# Altium PCB Kasli-DIOT.PCBDOC (part 20 of 23)
Units mm, origin at the board's own origin, x right, y up, seen from the top; angles counter-clockwise.
Board outline 222.9 x 100 mm, 10 copper layers (TopLayer, Layer 2, Layer 3, Layer 4, Layer 5, Layer 6, Layer 7, layer 8, Layer 9, BottomLayer), stack 1.564 mm thick; 977 components, 900 nets, 4676 pads, 2725 vias.
Unrouted connection lines stored in the file: 17.
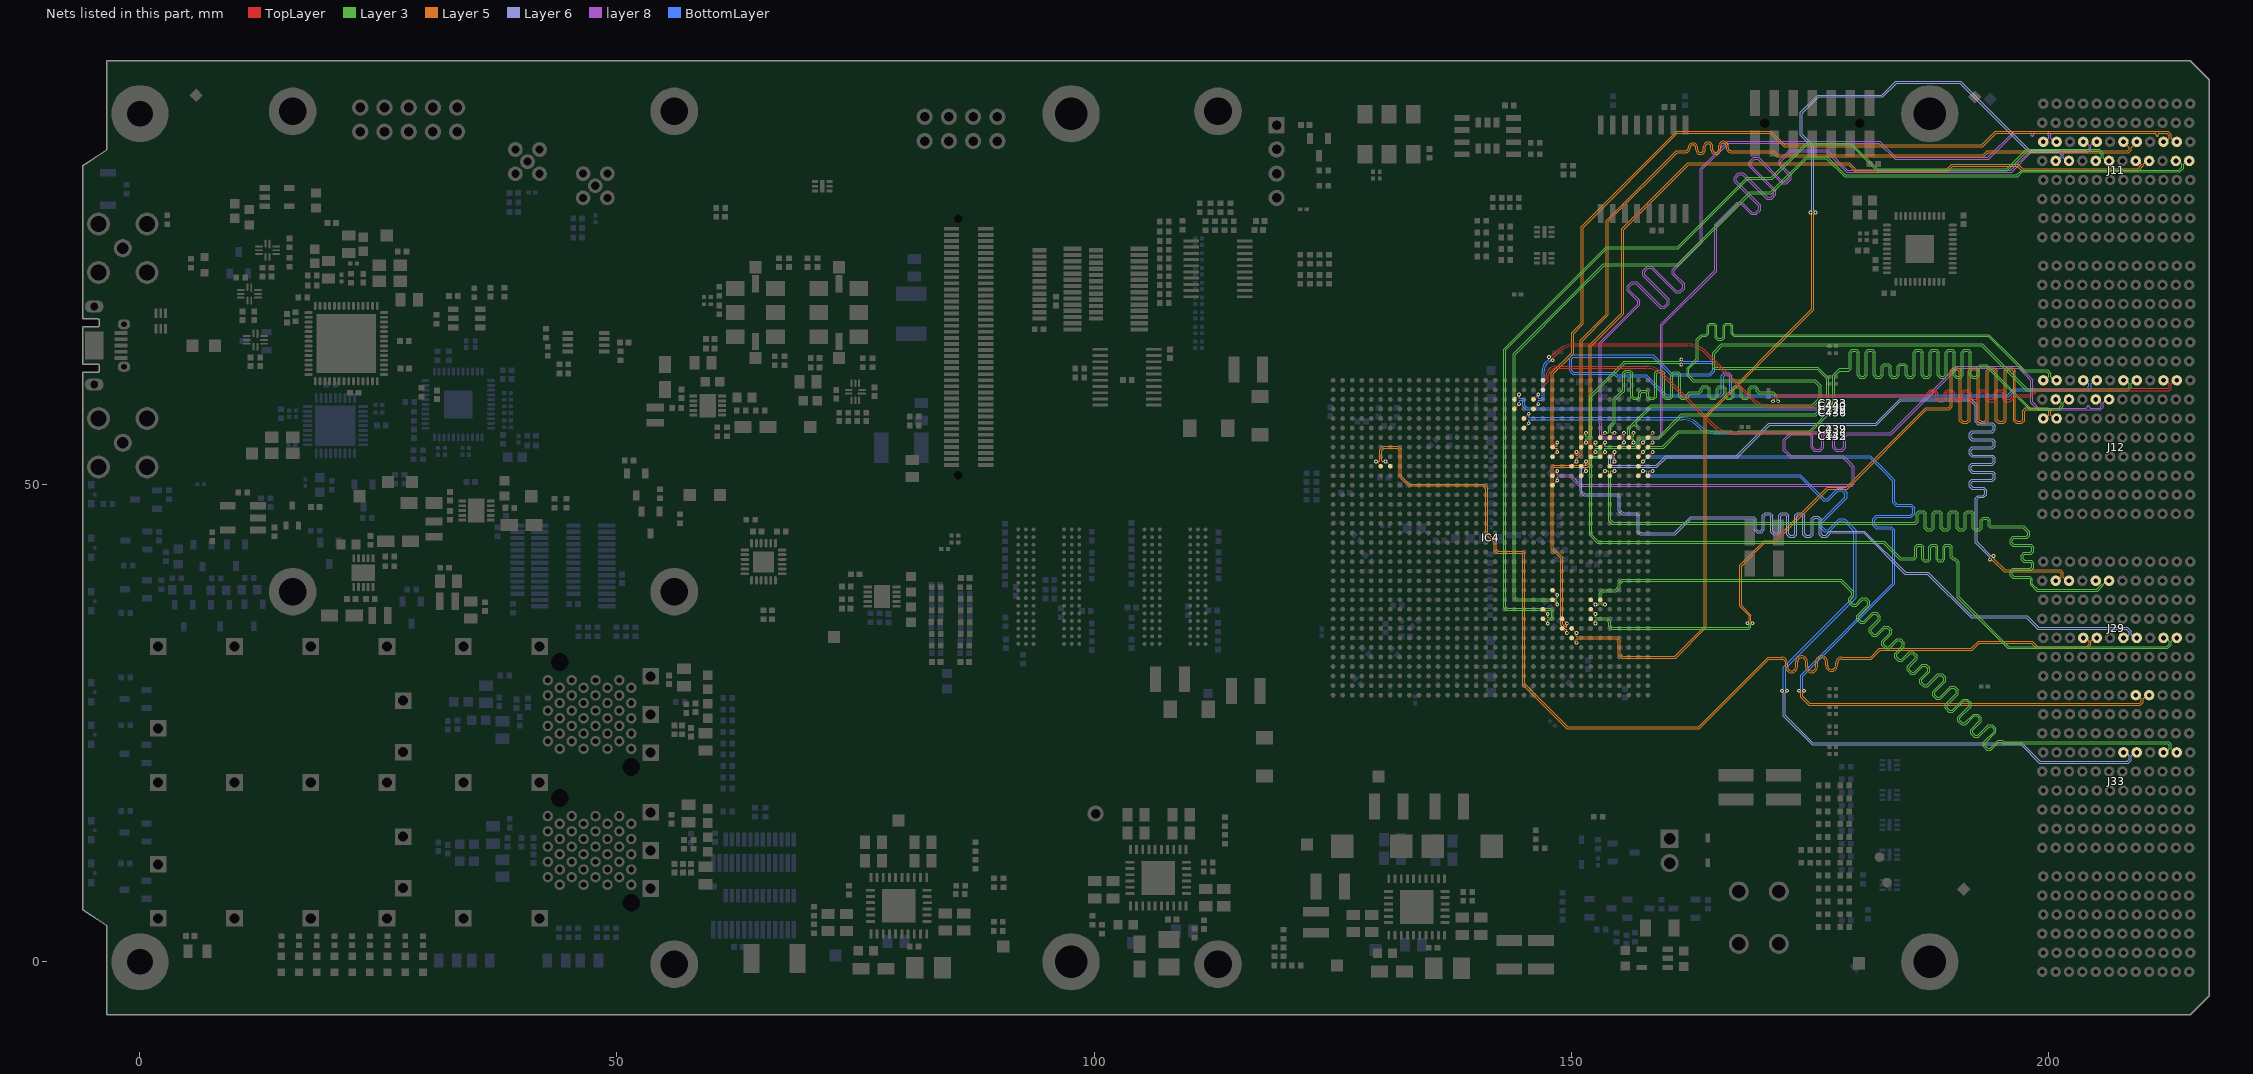
[diagram p26: the nets of this part, all layers, seen from the top]

## Via types
v1: diameter 0.4, hole 0.2, TopLayer to BottomLayer, tented both sides, 1723 vias
v2: diameter 0.5, hole 0.2, TopLayer to BottomLayer, tented both sides, 524 vias
v3: diameter 0.6, hole 0.3, TopLayer to BottomLayer, tented both sides, 172 vias
v4: diameter 0.6, hole 0.3, TopLayer to BottomLayer, 113 vias
v5: diameter 0.5, hole 0.2, TopLayer to BottomLayer, 107 vias
v6: diameter 0.4, hole 0.2, TopLayer to BottomLayer, 67 vias
v7: diameter 0.5, hole 0.25, TopLayer to BottomLayer, tented both sides, 12 vias
v8: diameter 0.8, hole 0.5, TopLayer to BottomLayer, tented both sides, 7 vias

## Nets (pads, with @x,y where several pads share a name; then routed paths per layer and width w, separated by ;. In a path a pad name is that pad's centre, name@x,y a point inside that pad or via, vN(x,y) a via of type N, cw(c..) or ccw(c..) an arc to the next point about the centre after c; other vN are vias at no path point) (continued)
SLOT5.LVDS_10_N: IC4.AF28 J12.L6 | length 107.6
  TopLayer w0.095: IC4.AF28@152.061,35.95 v1(152.561,35.45)
  Layer 3 w0.075: v1(152.561,35.45) 152.561,35.805 152.605,35.849 153.677,35.849 153.961,35.565 153.961,35.166 154.279,34.848 168.645,34.848 168.863,35.066 168.863,35.35 168.997,35.484 v1(169.026,35.484)
  Layer 5 w0.08: v1(169.026,35.484) 169.026,35.531 168.866,35.691 168.866,36.338 167.871,37.332 167.871,41.468 170.329,43.925 171.336,43.925 176.961,49.55 178.961,49.55 187.261,57.85 189.453,57.85 189.64,57.85 189.947,58.157 189.947,61.863 190.132,62.048 190.503,62.048 190.689,61.863 190.689,56.737 190.995,56.43 191.538,56.43 191.845,56.737 191.845,61.863 192.03,62.048 192.401,62.048 192.587,61.863 192.587,56.737 192.893,56.43 193.436,56.43 193.743,56.737 193.743,61.863 193.928,62.048 194.299,62.048 194.485,61.863 194.485,56.737 194.791,56.43 195.334,56.43 195.641,56.737 195.641,61.863 195.826,62.048 196.197,62.048 196.383,61.863 196.383,56.737 196.689,56.43 197.232,56.43 197.539,56.737 197.539,57.665 197.724,57.85 198.147,57.85 199.902,57.85 200.096,57.656 200.096,57.301 199.745,56.95 J12.L6@199.5,56.95
SLOT5.LVDS_10_P: IC4.AE28 J12.K6 | length 108
  TopLayer w0.095: IC4.AE28@152.061,36.95 v1(152.561,36.45)
  Layer 3 w0.075: v1(152.561,36.45) 152.561,36.095 152.605,36.051 153.761,36.051 154.163,35.649 154.163,35.25 154.363,35.05 168.561,35.05 168.661,35.15 168.661,35.35 168.527,35.484 v1(168.499,35.484)
  Layer 5 w0.08: v1(168.499,35.484) 168.499,35.531 168.659,35.691 168.659,36.252 167.664,37.247 167.664,41.553 170.243,44.132 171.25,44.132 176.875,49.757 178.875,49.757 187.175,58.057 189.453,58.057 189.554,58.057 189.74,58.242 189.74,61.949 190.046,62.255 190.589,62.255 190.896,61.949 190.896,56.823 191.081,56.637 191.452,56.637 191.638,56.823 191.638,61.949 191.944,62.255 192.487,62.255 192.794,61.949 192.794,56.823 192.979,56.637 193.35,56.637 193.536,56.823 193.536,61.949 193.842,62.255 194.385,62.255 194.692,61.949 194.692,56.823 194.877,56.637 195.248,56.637 195.434,56.823 195.434,61.949 195.74,62.255 196.283,62.255 196.59,61.949 196.59,56.823 196.775,56.637 197.146,56.637 197.332,56.823 197.332,57.75 197.638,58.057 198.147,58.057 199.988,58.057 200.303,57.742 200.303,57.301 200.655,56.95 J12.K6@200.9,56.95
SLOT5.LVDS_11_N: IC4.AD24 J11.B5 | length 112.2
  TopLayer w0.095: IC4.AD24@148.061,37.95 v1(148.561,37.45)
  Layer 3 w0.075: v1(148.561,37.45) 148.561,37.806 148.517,37.85 144.275,37.85 143.959,38.166 143.959,63.734 150.259,70.034 153.375,73.15 161.175,73.15 168.734,80.709 170.948,80.709 174.641,84.401 176.855,84.401 178.762,82.494 196.733,82.494 197.233,82.994 213.715,82.994 213.999,83.278 213.999,83.589 213.638,83.95 J11.B5@213.4,83.95
SLOT5.LVDS_11_P: IC4.AC24 J11.A5 | length 111.8
  TopLayer w0.095: IC4.AC24@148.061,38.95 v1(148.561,38.45)
  Layer 3 w0.075: v1(148.561,38.45) 148.561,38.096 148.517,38.052 144.359,38.052 144.161,38.25 144.161,63.65 150.461,69.95 153.459,72.948 161.259,72.948 168.818,80.507 171.032,80.507 174.724,84.199 176.772,84.199 178.62,82.352 178.679,82.292 196.817,82.292 197.317,82.792 213.799,82.792 214.201,83.194 214.201,83.589 214.562,83.95 J11.A5@214.8,83.95
SLOT5.LVDS_12_N: IC4.AG25 J11.E5 | length 108
  TopLayer w0.095: IC4.AG25@149.061,34.95 v1(149.561,34.45)
  Layer 5 w0.08: v1(149.561,34.45) 149.561,34.8 149.514,34.846 149.362,34.846 148.928,35.281 148.928,42.29 147.954,43.264 147.954,51.836 148.152,52.034 151.664,52.034 151.928,52.298 151.928,64.61 155.337,68.018 155.337,76.826 162.243,83.732 179.189,83.732 179.9,83.021 189.329,83.021 189.932,83.624 196.88,83.624 197.354,83.15 209.414,83.15 209.796,83.533 209.796,83.599 209.445,83.95 J11.E5@209.2,83.95
SLOT5.LVDS_12_P: IC4.AF25 J11.D5 | length 107.6
  TopLayer w0.095: IC4.AF25@149.061,35.95 v1(149.561,35.45)
  Layer 5 w0.08: v1(149.561,35.45) 149.561,35.1 149.514,35.053 149.448,35.053 149.135,35.366 149.135,42.376 148.161,43.35 148.161,51.75 148.238,51.827 151.749,51.827 152.135,52.212 152.135,64.524 155.544,67.933 155.544,76.74 162.329,83.525 179.103,83.525 179.815,82.814 189.415,82.814 190.018,83.417 196.794,83.417 197.268,82.943 209.499,82.943 210.003,83.447 210.003,83.599 210.354,83.95 J11.D5@210.6,83.95
SLOT5.LVDS_13_N: IC4.AF23 J11.H5 | length 109.2
  TopLayer w0.095: IC4.AF23@147.061,35.95 v1(147.561,35.45)
  Layer 3 w0.075: v1(147.561,35.45) 147.561,35.805 147.605,35.849 147.961,35.849 148.163,36.051 148.163,36.778 147.888,37.053 143.314,37.053 143.152,37.216 143.152,64.141 153.759,74.748 161.259,74.748 168.538,82.027 171.095,82.027 174.691,85.623 179.309,85.623 182.031,82.901 195.749,82.901 196.988,84.139 197.798,84.95 205.299,84.95 205.599,84.65 205.599,84.445 205.599,84.299 205.249,83.95 J11.H5@205,83.95
SLOT5.LVDS_13_P: IC4.AE23 J11.G5 | length 109.5
  TopLayer w0.095: IC4.AE23@147.061,36.95 v1(147.561,36.45)
  Layer 3 w0.075: v1(147.561,36.45) 147.561,36.095 147.605,36.051 147.877,36.051 147.961,36.135 147.961,36.694 147.804,36.851 143.23,36.851 142.95,37.132 142.95,64.224 153.675,74.95 161.175,74.95 168.454,82.229 171.012,82.229 174.607,85.825 179.393,85.825 182.115,83.103 195.666,83.103 197.715,85.152 205.382,85.152 205.801,84.734 205.801,84.361 205.801,84.299 206.15,83.95 J11.G5@206.4,83.95
SLOT5.LVDS_14_N: IC4.AH26 J11.K5 | length 109.4
  TopLayer w0.095: IC4.AH26@150.061,33.95 v1(150.561,33.45)
  Layer 5 w0.08: v1(150.561,33.45) 150.561,33.8 150.608,33.846 154.684,33.846 154.961,33.569 154.961,32.238 155.356,31.843 160.954,31.843 164.168,35.057 164.168,57.057 175.461,68.35 175.461,78.343 175.621,78.504 v1(175.621,78.55)
  Layer 6 w0.08: v1(175.621,78.55) 175.621,78.6 175.464,78.757 175.464,85.542 174.258,86.748 174.258,88.945 175.963,90.65 182.671,90.65 184.127,92.106 190.749,92.106 197.983,84.872 201.125,84.872 201.396,84.601 201.396,84.301 201.045,83.95 J11.K5@200.8,83.95
SLOT5.LVDS_14_P: IC4.AG26 J11.J5 | length 109.8
  TopLayer w0.095: IC4.AG26@150.061,34.95 v1(150.561,34.45)
  Layer 5 w0.08: v1(150.561,34.45) 150.561,34.1 150.608,34.053 154.769,34.053 155.168,33.655 155.168,32.324 155.442,32.05 160.868,32.05 163.961,35.143 163.961,57.143 175.254,68.435 175.254,78.343 175.094,78.503 v1(175.094,78.55)
  Layer 6 w0.08: v1(175.094,78.55) 175.094,78.594 175.257,78.757 175.257,85.456 174.051,86.662 174.051,89.031 175.877,90.857 182.585,90.857 184.041,92.313 190.835,92.313 198.069,85.079 201.211,85.079 201.603,84.687 201.603,84.301 201.954,83.95 J11.J5@202.2,83.95
SLOT5.LVDS_15_N: IC4.AD29 J33.C6 | length 107.5
  TopLayer w0.095: IC4.AD29@153.061,37.95 v1(153.561,37.45)
  Layer 3 w0.075: v1(153.561,37.45) 153.21,37.45 153.166,37.494 153.166,38.571 153.41,38.814 154.725,38.814 154.939,39.028 ccw(c154.561,39.45) 154.983,39.072 155.161,39.25 155.161,39.565 155.479,39.883 178.242,39.883 178.487,39.638 178.555,39.57 179.43,38.695 179.43,38.434 179.096,38.1 179.096,37.672 179.475,37.293 179.903,37.293 180.579,37.969 180.84,37.969 181.1,37.709 181.1,37.448 179.935,36.283 179.935,35.855 180.314,35.476 180.742,35.476 181.688,36.422 181.948,36.422 182.209,36.161 182.209,35.901 181.263,34.955 181.263,34.527 181.642,34.148 182.07,34.148 182.893,34.972 183.154,34.972 183.414,34.711 183.414,34.45 182.591,33.627 182.591,33.199 182.97,32.82 183.398,32.82 184.221,33.644 184.482,33.644 184.742,33.383 184.742,33.123 183.919,32.299 183.919,31.871 184.298,31.492 184.726,31.492 185.549,32.316 185.81,32.316 186.07,32.055 186.07,31.795 185.247,30.971 185.247,30.543 185.626,30.164 186.054,30.164 186.877,30.988 187.138,30.988 187.398,30.727 187.398,30.467 186.575,29.643 186.575,29.215 186.954,28.837 187.382,28.837 188.547,30.002 188.808,30.002 189.068,29.741 189.068,29.481 187.903,28.315 187.903,27.888 188.282,27.509 188.71,27.509 189.875,28.674 190.135,28.674 190.396,28.413 190.396,28.153 189.231,26.987 189.231,26.56 189.61,26.181 190.038,26.181 191.203,27.346 191.463,27.346 191.724,27.085 191.724,26.825 190.559,25.66 190.559,25.232 190.938,24.853 191.366,24.853 192.285,25.773 192.546,25.773 192.807,25.512 192.807,25.252 191.887,24.332 191.887,23.904 192.266,23.525 192.693,23.525 193.82,24.651 194.08,24.651 194.341,24.39 194.341,24.13 193.215,23.004 193.215,22.576 193.594,22.197 194.021,22.197 194.845,23.02 195.105,23.02 195.174,22.952 195.275,22.85 212.563,22.85 212.699,22.714 212.699,22.311 212.338,21.95 J33.C6@212.1,21.95
SLOT5.LVDS_15_P: IC4.AD28 J33.B6 | length 108.1
  TopLayer w0.095: IC4.AD28@152.061,37.95 v1(152.561,37.45)
  Layer 3 w0.075: v1(152.561,37.45) 152.92,37.45 152.964,37.494 152.964,38.654 153.326,39.017 154.642,39.017 154.801,39.176 ccw(c154.561,39.45) 154.835,39.21 154.959,39.334 154.959,39.649 155.395,40.085 178.326,40.085 178.63,39.781 178.698,39.713 179.632,38.779 179.632,38.351 179.298,38.016 179.298,37.756 179.559,37.495 179.819,37.495 180.496,38.171 180.924,38.171 181.302,37.793 181.302,37.365 180.137,36.199 180.137,35.939 180.398,35.678 180.658,35.678 181.604,36.624 182.032,36.624 182.411,36.245 182.411,35.817 181.465,34.871 181.465,34.611 181.726,34.35 181.986,34.35 182.81,35.174 183.237,35.174 183.616,34.795 183.616,34.367 182.793,33.544 182.793,33.283 183.054,33.022 183.314,33.022 184.137,33.846 184.565,33.846 184.944,33.467 184.944,33.039 184.121,32.216 184.121,31.955 184.382,31.694 184.642,31.694 185.465,32.518 185.893,32.518 186.272,32.139 186.272,31.711 185.449,30.888 185.449,30.627 185.71,30.366 185.97,30.366 186.793,31.19 187.221,31.19 187.6,30.811 187.6,30.383 186.777,29.56 186.777,29.299 187.037,29.039 187.298,29.039 188.463,30.204 188.891,30.204 189.27,29.825 189.27,29.397 188.105,28.232 188.105,27.971 188.365,27.711 188.626,27.711 189.791,28.876 190.219,28.876 190.598,28.497 190.598,28.069 189.433,26.904 189.433,26.643 189.693,26.383 189.954,26.383 191.119,27.548 191.547,27.548 191.926,27.169 191.926,26.741 190.761,25.576 190.761,25.315 191.021,25.055 191.282,25.055 192.202,25.975 192.63,25.975 193.009,25.596 193.009,25.168 192.089,24.248 192.089,23.987 192.349,23.727 192.61,23.727 193.736,24.853 194.164,24.853 194.543,24.474 194.543,24.046 193.417,22.92 193.417,22.659 193.677,22.399 193.938,22.399 194.761,23.222 195.189,23.222 195.248,23.163 195.257,23.154 195.316,23.095 195.359,23.052 212.647,23.052 212.901,22.798 212.901,22.311 213.262,21.95 J33.B6@213.5,21.95
SLOT5_MGT.MGT_Rx_N: C439.2 IC4.E21 | length 33.1
  TopLayer w0.095: IC4.E21@145.061,56.95 v1(145.561,57.45)
  BottomLayer w0.095: v1(145.561,57.45) 145.561,57.117 145.617,57.061 151.364,57.061 161.645,57.061 cw(c161.645,54.661) 163.342,56.358 163.404,56.296 ccw(c165.2,58.092) 165.2,55.552 176.794,55.552 ccw(c176.794,55.695) 176.895,55.594 ccw(c176.861,55.628) 176.909,55.628 cw(c176.956,55.628) 176.923,55.661 177.043,55.782 cw(c177.086,55.74) C439.2@177.086,55.8
SLOT5_MGT.MGT_Rx_P: C435.2 IC4.F21 | length 33.1
  TopLayer w0.095: IC4.F21@145.061,55.95 v1(145.561,56.45)
  BottomLayer w0.095: v1(145.561,56.45) 145.561,56.783 145.617,56.839 161.643,56.839 cw(c161.643,54.657) 163.186,56.2 163.247,56.139 ccw(c165.199,58.091) 165.199,55.33 176.794,55.33 cw(c176.794,55.188) 176.895,55.289 cw(c176.861,55.255) 176.909,55.255 ccw(c176.956,55.255) 176.922,55.221 177.043,55.1 ccw(c177.086,55.143) C435.2@177.086,55.083
SLOT5_MGT.MGT_Tx_N: C232.1 IC4.A23 | length 33.8
  TopLayer w0.095: IC4.A23@147.061,60.95 147.128,61.017 147.359,61.017 147.414,61.073 147.414,61.158 147.411,61.162 147.411,61.501 cw(c148.228,61.501) 147.65,62.078 147.73,62.158 cw(c148.367,61.521) 148.367,62.422 157.894,62.422 cw(c157.894,59.985) 159.617,61.708 163.568,57.757 165.029,56.296 ccw(c166.825,58.092) 166.825,55.552 176.794,55.552 ccw(c176.794,55.695) 176.895,55.594 ccw(c176.861,55.628) 176.909,55.628 cw(c176.956,55.628) 176.922,55.661 177.043,55.782 cw(c177.086,55.74) C232.1@177.086,55.8
SLOT5_MGT.MGT_Tx_P: C142.1 IC4.B23 | length 34.4
  TopLayer w0.095: IC4.B23@147.061,59.95 147.093,59.982 147.093,60.327 147.636,60.871 147.636,61.25 147.633,61.253 147.633,61.5 cw(c148.229,61.5) 147.808,61.922 147.886,62 cw(c148.369,61.517) 148.369,62.2 157.892,62.2 cw(c157.892,59.981) 159.461,61.55 164.872,56.139 ccw(c166.824,58.091) 166.824,55.33 176.794,55.33 cw(c176.794,55.188) 176.895,55.289 cw(c176.861,55.255) 176.909,55.255 ccw(c176.956,55.255) 176.922,55.221 177.043,55.1 ccw(c177.086,55.143) C142.1@177.086,55.083
SLOT6.LVDS_0_N: IC4.H28 J29.C4 | length 88.2
  TopLayer w0.095: IC4.H28@152.061,53.95 v1(152.561,54.45)
  Layer 3 w0.075: v1(152.561,54.45) 152.561,54.095 152.605,54.051 152.931,54.051 153.163,53.819 153.163,53.066 152.911,52.815 152.286,52.815 152.161,52.689 152.161,44.774 152.835,44.1 182.811,44.1 184.553,42.358 185.811,42.358 185.907,42.358 186.041,42.492 186.041,43.497 186.294,43.749 186.73,43.749 186.982,43.497 186.982,42.267 187.117,42.133 187.385,42.133 187.519,42.267 187.519,43.497 187.772,43.749 188.208,43.749 188.46,43.497 188.46,42.267 188.595,42.133 188.863,42.133 188.997,42.267 188.997,43.497 189.25,43.749 189.686,43.749 189.938,43.497 189.938,42.492 190.073,42.358 190.246,42.358 190.526,42.078 190.611,41.993 190.67,41.934 190.67,38.26 195.88,33.05 212.454,33.05 212.699,33.295 212.699,33.589 212.338,33.95 J29.C4@212.1,33.95
SLOT6.LVDS_0_P: IC4.J28 J29.B4 | length 88.5
  TopLayer w0.095: IC4.J28@152.061,52.95 v1(152.561,53.45)
  Layer 3 w0.075: v1(152.561,53.45) 152.561,53.805 152.605,53.849 152.847,53.849 152.961,53.735 152.961,53.15 152.828,53.017 152.203,53.017 151.959,52.773 151.959,44.691 152.752,43.898 182.727,43.898 184.469,42.156 185.811,42.156 185.991,42.156 186.243,42.409 186.243,43.413 186.378,43.547 186.646,43.547 186.78,43.413 186.78,42.184 187.033,41.931 187.469,41.931 187.721,42.184 187.721,43.413 187.856,43.547 188.124,43.547 188.258,43.413 188.258,42.184 188.511,41.931 188.947,41.931 189.199,42.184 189.199,43.413 189.334,43.547 189.602,43.547 189.736,43.413 189.736,42.409 189.989,42.156 190.162,42.156 190.425,41.894 190.468,41.85 190.468,38.176 195.797,32.848 212.538,32.848 212.901,33.211 212.901,33.589 213.262,33.95 J29.B4@213.5,33.95
SLOT6.LVDS_1_N: IC4.K27 J29.F4 | length 88.1
  TopLayer w0.095: IC4.K27@151.061,51.95 v1(151.561,52.45)
  Layer 6 w0.08: v1(151.561,52.45) 151.561,52.144 151.444,52.027 151.203,52.027 150.943,51.767 150.943,49.253 151.346,48.85 153.761,48.85 154.737,48.85 154.965,48.622 154.965,47.272 155.387,46.85 156.761,46.85 156.954,46.657 156.954,45.064 157.275,44.743 160.905,44.743 162.612,46.45 168.109,46.45 169.059,46.45 169.219,46.29 169.219,45.264 169.501,44.982 169.993,44.982 170.275,45.264 170.275,46.703 170.436,46.863 170.757,46.863 170.917,46.703 170.917,45.043 171.199,44.762 171.691,44.762 171.973,45.043 171.973,46.703 172.134,46.863 172.455,46.863 172.615,46.703 172.615,44.762 172.897,44.48 173.389,44.48 173.671,44.762 173.671,46.703 173.832,46.863 174.153,46.863 174.313,46.703 174.313,44.762 174.595,44.48 175.087,44.48 175.369,44.762 175.369,46.357 175.53,46.517 175.851,46.517 176.011,46.357 176.011,44.762 176.293,44.48 176.785,44.48 177.067,44.762 177.067,44.79 177.228,44.95 177.424,44.95 180.668,44.95 184.98,40.639 187.352,40.639 191.932,36.058 197.725,36.058 198.934,34.85 208.213,34.85 208.496,34.567 208.496,34.301 208.145,33.95 J29.F4@207.9,33.95
SLOT6.LVDS_1_P: IC4.L27 J29.E4 | length 87.7
  TopLayer w0.095: IC4.L27@151.061,50.95 v1(151.561,51.45)
  Layer 6 w0.08: v1(151.561,51.45) 151.5,51.511 151.5,51.773 151.453,51.82 151.289,51.82 151.15,51.682 151.15,49.339 151.432,49.057 153.847,49.057 154.823,49.057 155.172,48.708 155.172,47.358 155.473,47.057 156.847,47.057 157.161,46.743 157.161,45.15 157.361,44.95 160.82,44.95 162.527,46.657 168.109,46.657 169.144,46.657 169.426,46.375 169.426,45.349 169.587,45.189 169.908,45.189 170.068,45.349 170.068,46.788 170.35,47.07 170.842,47.07 171.124,46.788 171.124,45.129 171.285,44.969 171.606,44.969 171.766,45.129 171.766,46.788 172.048,47.07 172.54,47.07 172.822,46.788 172.822,44.847 172.983,44.687 173.304,44.687 173.464,44.847 173.464,46.788 173.746,47.07 174.238,47.07 174.52,46.788 174.52,44.847 174.681,44.687 175.002,44.687 175.162,44.847 175.162,46.442 175.444,46.724 175.936,46.724 176.218,46.442 176.218,44.847 176.379,44.687 176.7,44.687 176.86,44.847 176.86,44.875 177.142,45.157 177.424,45.157 180.754,45.157 185.065,40.846 187.438,40.846 192.018,36.265 197.811,36.265 199.02,35.057 208.299,35.057 208.703,34.653 208.703,34.301 209.054,33.95 J29.E4@209.3,33.95
SLOT6.LVDS_2_N: IC4.J34 J29.E1 | length 99
  TopLayer w0.095: IC4.J34@158.061,52.95 v1(158.561,53.45)
  Layer 5 w0.08: v1(174.436,28.415) 174.436,28.369 174.276,28.209 174.276,27.835 175.027,27.084 209.589,27.084 209.796,27.291 209.796,27.58 209.426,27.95 J29.E1@209.2,27.95
  BottomLayer w0.095: v1(158.561,53.45) 158.292,53.181 158.292,53.102 158.348,53.047 181.382,53.047 182.822,51.607 183.944,50.484 183.944,49.31 183.944,48.218 184.184,47.978 185.683,47.978 186.052,47.609 186.052,46.947 185.683,46.577 182.076,46.577 181.836,46.338 181.836,45.86 182.076,45.62 183.575,45.62 183.944,45.251 183.944,45.047 183.944,39.609 174.283,29.947 174.283,28.624 174.436,28.471 v1(174.436,28.415)
SLOT6.LVDS_2_P: IC4.K33 J29.D1 | length 99.7
  TopLayer w0.095: IC4.K33@157.061,51.95 v1(157.561,52.45)
  Layer 5 w0.08: v1(173.909,28.415) 173.909,28.369 174.069,28.209 174.069,27.75 174.941,26.877 209.675,26.877 210.003,27.206 210.003,27.58 210.374,27.95 J29.D1@210.6,27.95
  BottomLayer w0.095: v1(157.561,52.45) 157.943,52.832 158.171,52.832 158.178,52.825 181.29,52.825 182.508,51.607 182.665,51.45 183.722,50.392 183.722,49.31 183.722,48.126 184.092,47.756 185.591,47.756 185.83,47.517 185.83,47.039 185.591,46.799 181.984,46.799 181.614,46.43 181.614,45.768 181.984,45.398 183.483,45.398 183.722,45.159 183.722,45.047 183.722,39.701 174.061,30.039 174.061,28.624 173.909,28.471 v1(173.909,28.415)
SLOT6.LVDS_3_N: IC4.L30 J29.H7 | length 87.8
  TopLayer w0.095: IC4.L30@154.061,50.95 v1(154.561,51.45)
  Layer 3 w0.075: v1(154.561,51.45) 154.206,51.45 154.162,51.406 154.162,49.2 154.161,49.199 154.161,46.335 154.254,46.241 154.424,46.072 185.939,46.072 186.036,46.072 186.195,46.231 186.195,47.004 186.473,47.282 186.959,47.282 187.236,47.004 187.236,45.541 187.395,45.382 187.714,45.382 187.873,45.541 187.873,47.004 188.151,47.282 188.637,47.282 188.914,47.004 188.914,45.541 189.073,45.382 189.392,45.382 189.551,45.541 189.551,47.004 189.829,47.282 190.315,47.282 190.592,47.004 190.592,45.541 190.751,45.382 191.07,45.382 191.229,45.541 191.229,47.004 191.507,47.282 191.993,47.282 192.27,47.004 192.27,45.541 192.429,45.382 192.748,45.382 192.907,45.541 192.907,46.31 193.185,46.588 193.671,46.588 193.948,46.31 193.948,45.754 194.016,45.686 194.028,45.686 197.451,45.686 197.595,45.541 198.074,45.063 198.074,44.67 197.796,44.392 196.385,44.392 196.226,44.233 196.226,43.915 196.385,43.755 198.234,43.755 198.512,43.478 198.512,42.992 198.234,42.714 197.54,42.714 197.381,42.555 197.381,42.237 197.54,42.077 198.234,42.077 198.512,41.8 198.512,41.314 198.234,41.036 196.385,41.036 196.226,40.877 196.226,40.559 196.385,40.399 198.093,40.399 198.37,40.122 198.37,39.941 198.37,39.599 198.919,39.05 205.11,39.05 205.599,39.539 205.599,39.601 205.249,39.95 J29.H7@205,39.95
SLOT6.LVDS_3_P: IC4.L29 J29.G7 | length 88.5
  TopLayer w0.095: IC4.L29@153.061,50.95 v1(153.561,51.45)
  Layer 3 w0.075: v1(153.561,51.45) 153.916,51.45 153.96,51.406 153.96,49.283 153.959,49.282 153.959,46.251 154.34,45.87 185.939,45.87 186.12,45.87 186.397,46.147 186.397,46.92 186.556,47.08 186.875,47.08 187.034,46.92 187.034,45.457 187.312,45.18 187.798,45.18 188.075,45.457 188.075,46.92 188.234,47.08 188.553,47.08 188.712,46.92 188.712,45.457 188.99,45.18 189.476,45.18 189.753,45.457 189.753,46.92 189.912,47.08 190.231,47.08 190.39,46.92 190.39,45.457 190.668,45.18 191.154,45.18 191.431,45.457 191.431,46.92 191.59,47.08 191.909,47.08 192.068,46.92 192.068,45.457 192.346,45.18 192.832,45.18 193.109,45.457 193.109,46.226 193.268,46.386 193.587,46.386 193.746,46.226 193.746,45.67 193.814,45.602 193.933,45.484 194.028,45.484 195.986,45.484 197.367,45.484 197.872,44.979 197.872,44.754 197.712,44.594 196.302,44.594 196.024,44.317 196.024,43.831 196.302,43.553 198.151,43.553 198.31,43.394 198.31,43.076 198.151,42.916 197.457,42.916 197.179,42.639 197.179,42.153 197.457,41.875 198.151,41.875 198.31,41.716 198.31,41.398 198.151,41.238 196.302,41.238 196.024,40.961 196.024,40.475 196.302,40.197 198.009,40.197 198.168,40.038 198.168,39.941 198.168,39.515 198.836,38.848 205.194,38.848 205.801,39.455 205.801,39.601 206.15,39.95 J29.G7@206.4,39.95
SLOT6.LVDS_4_N: IC4.J30 J29.K7 | length 89.9
  TopLayer w0.095: IC4.J30@154.061,52.95 v1(154.561,53.45)
  Layer 5 w0.08: v1(193.907,42.15) 193.94,42.117 194.167,42.117 195.41,40.874 201.242,40.874 201.396,40.72 201.396,40.301 201.045,39.95 J29.K7@200.8,39.95
  Layer 6 w0.08: v1(154.561,53.45) 154.561,53.1 154.514,53.054 154.233,53.054 153.954,52.774 153.954,52.064 154.175,51.843 159.01,51.843 160.014,52.847 167.412,52.847 170.808,56.243 182.016,56.243 184.571,58.797 191.847,58.797 192.354,58.29 192.354,56.781 192.354,56.595 192.636,56.313 194.115,56.313 194.275,56.152 194.275,55.831 194.115,55.671 192.01,55.671 191.728,55.389 191.728,54.897 192.01,54.615 194.115,54.615 194.275,54.454 194.275,54.133 194.115,53.973 192.01,53.973 191.728,53.691 191.728,53.199 192.01,52.917 194.115,52.917 194.275,52.756 194.275,52.435 194.115,52.275 192.01,52.275 191.728,51.993 191.728,51.501 192.01,51.219 194.115,51.219 194.275,51.058 194.275,50.737 194.115,50.577 192.01,50.577 191.728,50.295 191.728,49.803 192.01,49.521 193.189,49.521 193.349,49.36 193.349,49.039 193.189,48.879 192.636,48.879 192.354,48.597 192.354,47.646 192.354,43.929 193.874,42.409 193.874,42.183 v1(193.907,42.15)
SLOT6.LVDS_4_P: IC4.K30 J29.J7 | length 89.6
  TopLayer w0.095: IC4.K30@154.061,51.95 v1(154.561,52.45)
  Layer 5 w0.08: v1(194.28,42.523) 194.313,42.489 194.313,42.263 195.495,41.081 201.328,41.081 201.603,40.805 201.603,40.301 201.955,39.95 J29.J7@202.2,39.95
  Layer 6 w0.08: v1(154.561,52.45) 154.561,52.8 154.514,52.847 154.319,52.847 154.161,52.688 154.161,52.15 154.261,52.05 158.925,52.05 159.928,53.054 167.326,53.054 170.723,56.45 181.931,56.45 184.485,59.004 191.933,59.004 192.561,58.376 192.561,56.781 192.561,56.68 192.721,56.52 194.2,56.52 194.482,56.238 194.482,55.746 194.2,55.464 192.095,55.464 191.935,55.303 191.935,54.982 192.095,54.822 194.2,54.822 194.482,54.54 194.482,54.048 194.2,53.766 192.095,53.766 191.935,53.605 191.935,53.284 192.095,53.124 194.2,53.124 194.482,52.842 194.482,52.35 194.2,52.068 192.095,52.068 191.935,51.907 191.935,51.586 192.095,51.426 194.2,51.426 194.482,51.144 194.482,50.652 194.2,50.37 192.095,50.37 191.935,50.209 191.935,49.888 192.095,49.728 193.274,49.728 193.556,49.446 193.556,48.954 193.274,48.672 192.721,48.672 192.561,48.511 192.561,47.646 192.561,44.015 194.02,42.556 194.247,42.556 v1(194.28,42.523)
SLOT6.LVDS_5_N: IC4.L24 J12.H7 | length 90.1
  TopLayer w0.095: IC4.L24@148.061,50.95 v1(148.561,51.45)
  layer 8 w0.075: v1(148.561,51.45) 148.561,51.095 148.605,51.051 149.96,51.051 150.49,50.521 150.561,50.45 150.966,50.045 179.371,50.045 179.498,50.173 179.498,51.812 178.86,52.45 178.462,52.848 172.994,52.848 172.653,53.188 172.271,53.57 172.271,54.744 172.977,55.45 174.1,55.45 175.005,55.45 175.357,55.097 175.357,53.964 175.592,53.73 176.06,53.73 176.294,53.964 176.294,55.196 176.647,55.549 177.283,55.549 177.635,55.196 177.635,53.964 177.87,53.73 178.338,53.73 178.572,53.964 178.572,55.097 178.925,55.45 179.105,55.45 183.474,55.45 190.439,62.415 196.999,62.415 198.407,61.007 198.407,58.687 199.045,58.05 203.953,58.05 203.991,58.05 ccw(c203.991,58.162) 204.103,58.162 204.103,58.201 cw(c204.216,58.201) 204.216,58.314 cw(c204.216,58.201) 204.328,58.201 204.328,58.162 ccw(c204.441,58.162) 204.441,58.05 205.085,58.05 205.411,58.05 205.599,58.238 205.599,58.601 205.249,58.95 J12.H7@205,58.95
SLOT6.LVDS_5_P: IC4.M24 J12.G7 | length 90.1
  TopLayer w0.095: IC4.M24@148.061,49.95 v1(148.561,50.45)
  layer 8 w0.075: v1(148.561,50.45) 148.561,50.805 148.605,50.849 149.876,50.849 150.882,49.843 179.454,49.843 179.7,50.089 179.7,51.895 179.145,52.45 178.545,53.05 173.077,53.05 172.653,53.474 172.473,53.654 172.473,54.66 173.061,55.248 174.1,55.248 174.921,55.248 175.155,55.014 175.155,53.88 175.508,53.528 176.144,53.528 176.496,53.88 176.496,55.113 176.731,55.347 177.199,55.347 177.433,55.113 177.433,53.88 177.786,53.528 178.422,53.528 178.774,53.88 178.774,55.014 179.009,55.248 179.105,55.248 183.558,55.248 190.522,62.213 196.916,62.213 197.405,61.723 197.548,61.581 198.205,60.923 198.205,58.604 198.961,57.848 205.495,57.848 205.801,58.154 205.801,58.601 206.15,58.95 J12.G7@206.4,58.95
SLOT6.LVDS_6_N: IC4.H34 J12.K7 | length 87.7
  TopLayer w0.095: IC4.H34@158.061,53.95 v1(158.561,54.45)
  Layer 3 w0.075: v1(158.561,54.45) 158.267,54.156 158.267,54.094 158.311,54.05 159.634,54.05 161.234,55.65 166.801,55.65 ccw(c167.186,56.025) 167.571,55.65 175.005,55.65 177.459,58.104 177.459,61.502 178.15,62.193 179.133,62.193 179.17,62.231 179.17,63.906 179.448,64.184 179.934,64.184 180.211,63.906 180.211,61.553 180.37,61.394 180.689,61.394 180.848,61.553 180.848,63.906 181.126,64.184 181.612,64.184 181.889,63.906 181.889,61.553 182.048,61.394 182.367,61.394 182.526,61.553 182.526,62.426 182.804,62.704 183.29,62.704 183.567,62.426 183.567,61.553 183.726,61.394 184.045,61.394 184.204,61.553 184.204,62.435 184.482,62.713 184.968,62.713 185.245,62.435 185.245,61.553 185.404,61.394 185.723,61.394 185.882,61.553 185.882,63.906 186.16,64.184 186.646,64.184 186.923,63.906 186.923,61.553 187.082,61.394 187.401,61.394 187.56,61.553 187.56,63.906 187.838,64.184 188.324,64.184 188.601,63.906 188.601,61.553 188.76,61.394 189.079,61.394 189.238,61.553 189.238,63.906 189.516,64.184 190.002,64.184 190.279,63.906 190.279,61.553 190.438,61.394 190.757,61.394 190.916,61.553 190.916,63.906 191.194,64.184 191.68,64.184 191.957,63.906 191.957,61.553 192.116,61.394 192.435,61.394 192.594,61.553 192.594,62.324 192.872,62.602 193.302,62.602 193.592,62.602 198.144,58.05 201.108,58.05 201.399,58.341 201.399,58.589 201.038,58.95 J12.K7@200.8,58.95
SLOT6.LVDS_6_P: IC4.J33 J12.J7 | length 88.4
  TopLayer w0.095: IC4.J33@157.061,52.95 v1(157.561,53.45)
  Layer 3 w0.075: v1(157.561,53.45) 157.959,53.848 159.717,53.848 161.317,55.448 166.723,55.448 ccw(c167.186,56.025) 167.649,55.448 175.089,55.448 177.661,58.02 177.661,61.418 178.15,61.907 179.133,61.907 179.372,62.147 179.372,63.823 179.531,63.982 179.85,63.982 180.009,63.823 180.009,61.47 180.287,61.192 180.773,61.192 181.05,61.47 181.05,63.823 181.209,63.982 181.528,63.982 181.687,63.823 181.687,61.47 181.965,61.192 182.451,61.192 182.728,61.47 182.728,62.343 182.887,62.502 183.206,62.502 183.365,62.343 183.365,61.47 183.643,61.192 184.129,61.192 184.406,61.47 184.406,62.351 184.565,62.51 184.884,62.51 185.043,62.351 185.043,61.47 185.321,61.192 185.807,61.192 186.084,61.47 186.084,63.823 186.243,63.982 186.562,63.982 186.721,63.823 186.721,61.47 186.999,61.192 187.485,61.192 187.762,61.47 187.762,63.823 187.921,63.982 188.24,63.982 188.399,63.823 188.399,61.47 188.677,61.192 189.163,61.192 189.44,61.47 189.44,63.823 189.599,63.982 189.918,63.982 190.077,63.823 190.077,61.47 190.355,61.192 190.841,61.192 191.118,61.47 191.118,63.823 191.277,63.982 191.596,63.982 191.755,63.823 191.755,61.47 192.033,61.192 192.519,61.192 192.796,61.47 192.796,62.241 192.955,62.4 193.302,62.4 193.508,62.4 198.06,57.848 201.191,57.848 201.601,58.257 201.601,58.589 201.962,58.95 J12.J7@202.2,58.95
SLOT6.LVDS_7_N: IC4.G30 J12.C8 | length 95.7
  TopLayer w0.095: IC4.G30@154.061,54.95 v1(154.561,55.45) ; v1(171.187,58.75) 171.187,58.798 171.339,58.95 171.339,59.242 171.547,59.45 187.061,59.45 187.174,59.45 187.338,59.614 187.338,59.664 187.632,59.958 188.144,59.958 188.439,59.664 188.439,59.106 188.603,58.942 188.932,58.942 189.096,59.106 189.096,59.664 189.39,59.958 189.903,59.958 190.197,59.664 190.197,59.106 190.361,58.942 190.69,58.942 190.854,59.106 190.854,59.664 191.148,59.958 191.661,59.958 191.955,59.664 191.955,59.106 192.119,58.942 192.448,58.942 192.612,59.106 192.612,59.664 192.906,59.958 193.419,59.958 193.713,59.664 193.713,59.106 193.877,58.942 194.206,58.942 194.37,59.106 194.37,59.664 194.664,59.958 195.177,59.958 195.471,59.664 195.471,59.106 195.635,58.942 195.964,58.942 196.128,59.106 196.128,59.156 196.422,59.45 197.461,59.45 198.111,59.45 198.761,60.1 212.608,60.1 212.689,60.181 212.689,60.593 212.332,60.95 J12.C8@212.1,60.95
  Layer 3 w0.075: v1(154.561,55.45) 154.206,55.45 154.162,55.494 154.162,56.045 154.648,56.53 154.648,58.878 155.161,59.392 155.319,59.55 155.341,59.55 155.619,59.828 155.619,61.655 155.778,61.815 156.097,61.815 156.256,61.655 156.256,59.22 156.534,58.942 157.019,58.942 157.297,59.22 157.297,59.551 157.456,59.711 157.775,59.711 157.934,59.551 157.934,59.22 158.212,58.942 158.697,58.942 158.975,59.22 158.975,61.655 159.134,61.815 159.453,61.815 159.612,61.655 159.612,59.22 159.89,58.942 160.375,58.942 160.653,59.22 160.653,61.501 160.812,61.661 161.131,61.661 161.29,61.501 161.29,59.22 161.568,58.942 162.053,58.942 162.331,59.22 162.331,59.391 162.49,59.55 162.752,59.55 163.283,59.55 163.463,59.55 163.741,59.828 163.741,59.999 163.9,60.158 164.219,60.158 164.378,59.999 164.378,59.22 164.655,58.942 165.141,58.942 165.419,59.22 165.419,59.999 165.578,60.158 165.897,60.158 166.056,59.999 166.056,59.22 166.333,58.942 166.819,58.942 167.097,59.22 167.097,59.999 167.256,60.158 167.575,60.158 167.734,59.999 167.734,59.22 168.011,58.942 168.497,58.942 168.775,59.22 168.775,59.999 168.934,60.158 169.253,60.158 169.412,59.999 169.412,59.828 169.689,59.55 170.486,59.55 171.116,59.55 171.349,59.317 171.349,58.956 171.187,58.794 v1(171.187,58.75)
SLOT6.LVDS_7_P: IC4.G29 J12.B8 | length 96.4
  TopLayer w0.095: IC4.G29@153.061,54.95 v1(153.561,55.45) ; v1(171.713,58.75) 171.713,58.798 171.561,58.95 171.561,59.15 171.639,59.228 187.061,59.228 187.265,59.228 187.56,59.522 187.56,59.572 187.724,59.736 188.053,59.736 188.217,59.572 188.217,59.014 188.511,58.72 189.024,58.72 189.318,59.014 189.318,59.572 189.482,59.736 189.811,59.736 189.975,59.572 189.975,59.014 190.269,58.72 190.782,58.72 191.076,59.014 191.076,59.572 191.24,59.736 191.569,59.736 191.733,59.572 191.733,59.014 192.027,58.72 192.54,58.72 192.834,59.014 192.834,59.572 192.998,59.736 193.327,59.736 193.491,59.572 193.491,59.014 193.785,58.72 194.298,58.72 194.592,59.014 194.592,59.572 194.756,59.736 195.085,59.736 195.249,59.572 195.249,59.014 195.543,58.72 196.056,58.72 196.35,59.014 196.35,59.064 196.514,59.228 197.461,59.228 198.203,59.228 198.853,59.878 212.7,59.878 212.911,60.089 212.911,60.593 213.268,60.95 J12.B8@213.5,60.95
  Layer 3 w0.075: v1(153.561,55.45) 153.916,55.45 153.96,55.494 153.96,56.128 154.446,56.614 154.446,58.962 155.161,59.678 155.235,59.752 155.258,59.752 155.417,59.911 155.417,61.739 155.695,62.017 156.18,62.017 156.458,61.739 156.458,59.303 156.617,59.144 156.936,59.144 157.095,59.303 157.095,59.635 157.373,59.913 157.858,59.913 158.136,59.635 158.136,59.303 158.295,59.144 158.614,59.144 158.773,59.303 158.773,61.739 159.051,62.017 159.536,62.017 159.814,61.739 159.814,59.303 159.973,59.144 160.292,59.144 160.451,59.303 160.451,61.585 160.729,61.863 161.214,61.863 161.492,61.585 161.492,59.303 161.651,59.144 161.97,59.144 162.129,59.303 162.129,59.474 162.407,59.752 162.752,59.752 163.283,59.752 163.38,59.752 163.539,59.911 163.539,60.082 163.816,60.36 164.302,60.36 164.58,60.082 164.58,59.303 164.739,59.144 165.058,59.144 165.217,59.303 165.217,60.082 165.494,60.36 165.98,60.36 166.258,60.082 166.258,59.303 166.417,59.144 166.736,59.144 166.895,59.303 166.895,60.082 167.172,60.36 167.658,60.36 167.936,60.082 167.936,59.303 168.095,59.144 168.414,59.144 168.573,59.303 168.573,60.082 168.85,60.36 169.336,60.36 169.614,60.082 169.614,59.911 169.773,59.752 170.486,59.752 171.199,59.752 171.551,59.4 171.551,58.956 171.713,58.794 v1(171.713,58.75)
SLOT6.LVDS_8_N: IC4.H29 J12.F8 | length 90.1
  TopLayer w0.095: IC4.H29@153.061,53.95 v1(153.561,54.45)
  Layer 3 w0.075: v1(153.561,54.45) 153.561,54.095 153.605,54.051 156.677,54.051 156.926,54.299 156.926,54.715 157.263,55.052 159.177,55.052 161.575,57.45 175.611,57.45 176.812,58.651 176.812,61.105 176.486,61.431 175.793,62.124 165.004,62.124 164.842,62.287 164.842,63.83 165.773,64.761 193.086,64.761 197.797,60.05 208.296,60.05 208.499,60.253 208.499,60.589 208.138,60.95 J12.F8@207.9,60.95
SLOT6.LVDS_8_P: IC4.J29 J12.E8 | length 90.4
  TopLayer w0.095: IC4.J29@153.061,52.95 v1(153.561,53.45)
  Layer 3 w0.075: v1(153.561,53.45) 153.561,53.805 153.605,53.849 156.761,53.849 157.128,54.215 157.128,54.631 157.347,54.85 159.261,54.85 161.659,57.248 175.695,57.248 177.014,58.567 177.014,61.189 176.772,61.431 175.876,62.326 165.088,62.326 165.044,62.37 165.044,63.746 165.857,64.559 193.002,64.559 197.714,59.848 208.38,59.848 208.701,60.169 208.701,60.589 209.062,60.95 J12.E8@209.3,60.95
SLOT6.LVDS_9_N: IC4.G27 J12.I8 | length 99.4
  TopLayer w0.095: IC4.G27@151.061,54.95 v1(151.561,55.45)
  Layer 3 w0.075: v1(151.561,55.45) 151.561,55.095 151.605,55.051 151.917,55.051 151.961,55.095 151.961,59.336 152.801,60.176 ccw(c152.561,60.45) 152.835,60.21 155.587,62.962 161.355,62.962 161.517,63.125 v1(161.561,63.125)
  BottomLayer w0.095: v1(161.561,63.125) 161.617,63.125 161.769,62.972 164.809,62.972 165.027,62.754 165.092,62.689 165.092,61.912 164.618,61.438 160.505,61.438 158.549,63.394 150.246,63.394 150.069,63.217 150.069,62.027 150.278,61.817 154.546,61.817 154.835,61.529 157.883,61.529 158.561,60.852 159.963,59.45 165.492,59.45 165.604,59.45 165.769,59.614 165.769,61.444 166.063,61.738 166.575,61.738 166.87,61.444 166.87,59.614 167.034,59.45 168.826,59.45 195.786,59.45 196.42,60.084 204.049,60.084 204.289,60.324 204.289,60.593 203.932,60.95 J12.I8@203.7,60.95
SLOT6.LVDS_9_P: IC4.H27 J12.H8 | length 99.8
  TopLayer w0.095: IC4.H27@151.061,53.95 v1(151.561,54.45)
  Layer 3 w0.075: v1(151.561,54.45) 151.561,54.805 151.605,54.849 152.001,54.849 152.163,55.011 152.163,59.252 152.939,60.028 ccw(c152.561,60.45) 152.983,60.072 155.671,62.76 161.355,62.76 161.517,62.598 v1(161.561,62.598)
  BottomLayer w0.095: v1(161.561,62.598) 161.617,62.598 161.769,62.75 164.717,62.75 164.87,62.598 164.87,62.004 164.526,61.66 160.597,61.66 158.641,63.616 150.154,63.616 149.847,63.309 149.847,61.935 149.912,61.87 150.186,61.595 154.454,61.595 154.743,61.307 157.791,61.307 158.247,60.852 158.404,60.695 159.871,59.228 165.492,59.228 165.696,59.228 165.991,59.522 165.991,61.352 166.155,61.516 166.483,61.516 166.648,61.352 166.648,59.522 166.942,59.228 168.826,59.228 195.878,59.228 196.512,59.862 204.141,59.862 204.511,60.232 204.511,60.593 204.868,60.95 J12.H8@205.1,60.95
SLOT6.LVDS_10_N: IC4.G32 J12.L8 | length 88.1
  TopLayer w0.095: IC4.G32@156.061,54.95 v1(156.561,55.45)
  Layer 3 w0.075: v1(156.561,55.45) 156.561,55.095 156.517,55.051 156.205,55.051 156.161,55.095 156.161,55.85 156.336,56.025 156.522,56.211 cw(c156.601,56.131) 156.681,56.211 156.739,56.152 ccw(c156.819,56.231) 156.899,56.152 ccw(c156.819,56.231) 156.899,56.311 156.84,56.37 cw(c156.919,56.449) 156.84,56.529 156.96,56.649 158.495,58.184 175.395,58.184 176.239,59.028 176.239,60.372 176.161,60.45 175.597,61.015 162.864,61.015 162.364,61.515 162.364,62.159 163.333,63.128 163.333,65.15 163.733,65.55 163.999,65.55 164.179,65.55 164.457,65.828 164.457,66.599 164.616,66.758 164.934,66.758 165.094,66.599 165.094,65.414 165.371,65.136 165.857,65.136 166.135,65.414 166.135,66.599 166.294,66.758 166.612,66.758 166.772,66.599 166.772,65.828 167.049,65.55 168.192,65.55 193.71,65.55 196.123,63.137 197.41,61.85 199.872,61.85 200.099,61.623 200.099,61.311 199.738,60.95 J12.L8@199.5,60.95
SLOT6.LVDS_10_P: IC4.H32 J12.K8 | length 88.6
  TopLayer w0.095: IC4.H32@156.061,53.95 v1(156.561,54.45)
  Layer 3 w0.075: v1(156.561,54.45) 156.561,54.805 156.517,54.849 156.121,54.849 155.959,55.011 155.959,55.934 158.411,58.386 175.311,58.386 176.037,59.112 176.037,60.288 175.513,60.812 162.78,60.812 162.162,61.431 162.162,62.242 163.131,63.212 163.131,65.234 163.65,65.752 163.999,65.752 164.095,65.752 164.255,65.911 164.255,66.682 164.532,66.96 165.018,66.96 165.296,66.682 165.296,65.497 165.455,65.338 165.773,65.338 165.933,65.497 165.933,66.682 166.21,66.96 166.696,66.96 166.974,66.682 166.974,65.911 167.133,65.752 168.192,65.752 193.794,65.752 196.123,63.422 197.494,62.052 199.956,62.052 200.301,61.707 200.301,61.311 200.662,60.95 J12.K8@200.9,60.95
SLOT6.LVDS_11_N: IC4.H24 J11.C6 | length 93.9
  TopLayer w0.095: IC4.H24@148.061,53.95 v1(148.561,54.45)
  Layer 5 w0.08: v1(148.561,54.45) 148.561,54.1 148.514,54.054 148.324,54.054 148.152,54.225 148.152,61.641 150.268,63.757 150.268,65.857 151.268,66.857 151.268,76.964 161.154,86.85 170.904,86.85 172.325,85.428 193.148,85.428 194.57,86.85 195.175,86.85 ; J11.C6@212.1,85.95 212.345,85.95 212.696,86.301 212.696,86.453 212.696,86.604 212.45,86.85 212.022,86.85 211.666,86.85 ccw(c211.666,86.735) 211.551,86.735 211.551,86.657 cw(c211.436,86.657) 211.436,86.542 cw(c211.436,86.657) 211.321,86.657 211.321,86.735 ccw(c211.206,86.735) 211.206,86.85 210.936,86.85 195.261,86.85 ; 195.175,86.85 195.261,86.85 ; 195.175,86.85 195.261,86.85
SLOT6.LVDS_11_P: IC4.J24 J11.B6 | length 94.5
  TopLayer w0.095: IC4.J24@148.061,52.95 v1(148.561,53.45)
  Layer 5 w0.08: v1(148.561,53.45) 148.561,53.8 148.514,53.847 148.238,53.847 147.945,54.14 147.945,61.727 150.061,63.843 150.061,65.943 151.061,66.943 151.061,77.05 161.068,87.057 170.989,87.057 172.411,85.635 193.063,85.635 194.485,87.057 212.536,87.057 212.903,86.69 212.903,86.368 212.903,86.301 213.254,85.95 J11.B6@213.5,85.95
SLOT6.LVDS_12_N: IC4.J26 J11.F6 | length 90.4
  TopLayer w0.095: IC4.J26@150.061,52.95 v1(150.561,53.45)
  Layer 5 w0.08: v1(150.561,53.45) 150.561,53.1 150.608,53.054 150.674,53.054 150.961,53.34 150.961,65.143 153.708,67.889 153.708,77.697 161.043,85.032 161.331,85.032 161.988,85.032 ccw(c161.988,85.326) 162.282,85.326 cw(c162.783,85.326) 163.284,85.326 163.284,85.126 ccw(c163.578,85.126) 163.872,85.126 163.872,85.426 cw(c164.373,85.426) 164.874,85.426 164.874,85.126 ccw(c165.168,85.126) 165.462,85.126 165.462,85.501 cw(c165.963,85.501) 166.464,85.501 166.464,85.326 ccw(c166.758,85.326) 166.758,85.032 167.697,85.032 171.235,85.032 171.666,84.602 193.194,84.602 193.625,85.032 208.382,85.032 208.496,85.147 208.496,85.355 207.901,85.95 J11.F6@207.9,85.95
SLOT6.LVDS_12_P: IC4.K26 J11.E6 | length 90.8
  TopLayer w0.095: IC4.K26@150.061,51.95 v1(150.561,52.45)
  Layer 5 w0.08: v1(150.561,52.45) 150.561,52.8 150.608,52.847 150.76,52.847 151.168,53.255 151.168,65.057 153.915,67.804 153.915,77.611 161.129,84.825 161.331,84.825 161.988,84.825 ccw(c161.988,85.326) 162.489,85.326 cw(c162.783,85.326) 163.077,85.326 163.077,85.126 ccw(c163.578,85.126) 164.079,85.126 164.079,85.426 cw(c164.373,85.426) 164.667,85.426 164.667,85.126 ccw(c165.168,85.126) 165.669,85.126 165.669,85.501 cw(c165.963,85.501) 166.257,85.501 166.257,85.326 ccw(c166.758,85.326) 166.758,84.825 167.697,84.825 171.149,84.825 171.58,84.395 193.28,84.395 193.711,84.825 208.468,84.825 208.703,85.061 208.703,85.355 J11.E6@209.3,85.95 J11.E6@209.3,85.95
SLOT6.LVDS_13_N: IC4.G34 J11.I6 | length 91
  TopLayer w0.095: IC4.G34@158.061,54.95 v1(158.561,55.45)
  layer 8 w0.075: v1(158.561,55.45) 158.561,55.371 158.379,55.19 158.379,55.06 158.423,55.017 159.127,55.017 159.38,55.269 159.38,66.804 165.059,72.484 165.059,77.248 167.054,79.243 167.423,79.612 167.922,79.612 168.997,78.536 169.329,78.536 169.66,78.868 169.66,79.199 167.094,81.765 167.094,82.264 167.543,82.713 168.042,82.713 170.608,80.147 170.939,80.147 171.271,80.478 171.271,80.81 168.704,83.376 168.704,83.875 169.154,84.324 169.653,84.324 172.219,81.758 172.55,81.758 172.881,82.089 172.881,82.421 171.806,83.496 171.806,83.995 171.933,84.122 172.918,85.107 176.852,85.107 178.977,82.983 196.107,82.983 198.112,84.988 198.171,85.047 204.079,85.047 204.299,85.267 204.299,85.589 203.938,85.95 J11.I6@203.7,85.95
SLOT6.LVDS_13_P: IC4.H33 J11.H6 | length 91.9
  TopLayer w0.095: IC4.H33@157.061,53.95 v1(157.561,54.45)
  layer 8 w0.075: v1(157.561,54.45) 157.926,54.815 159.211,54.815 159.582,55.185 159.582,66.721 165.261,72.4 165.261,77.164 167.197,79.1 167.507,79.41 167.838,79.41 168.914,78.334 169.412,78.334 169.862,78.784 169.862,79.283 167.296,81.849 167.296,82.18 167.627,82.511 167.958,82.511 170.524,79.945 171.023,79.945 171.473,80.395 171.473,80.893 168.906,83.46 168.906,83.791 169.238,84.122 169.569,84.122 172.135,81.556 172.634,81.556 173.083,82.006 173.083,82.504 172.008,83.58 172.008,83.911 172.076,83.979 173.002,84.905 176.768,84.905 178.893,82.781 196.19,82.781 198.255,84.845 204.163,84.845 204.501,85.183 204.501,85.589 204.862,85.95 J11.H6@205.1,85.95
SLOT6.LVDS_14_N: IC4.G31 J11.L6 | length 91.8
  TopLayer w0.095: IC4.G31@155.061,54.95 v1(155.561,55.45)
  layer 8 w0.075: v1(155.561,55.45) 155.561,55.095 155.517,55.051 153.36,55.051 153.261,55.15 153.183,55.228 153.161,55.25 153.161,56.38 cw(c153.496,56.421) 153.161,56.462 153.161,60.004 153.161,64.8 153.183,64.822 157.068,68.707 157.196,68.835 157.196,69.333 156.12,70.409 156.12,70.74 156.451,71.071 156.783,71.071 159.349,68.505 159.847,68.505 160.297,68.955 160.297,69.454 157.731,72.02 157.731,72.351 158.062,72.682 158.393,72.682 160.96,70.116 161.458,70.116 161.908,70.566 161.908,71.064 160.832,72.14 160.832,72.471 161.476,73.115 163.761,75.4 163.761,83.064 166.51,85.814 182.279,85.814 183.971,84.121 193.79,84.121 193.85,84.181 196.529,86.86 197.877,86.86 198.14,86.86 cw(c198.14,86.747) 198.252,86.747 198.252,86.664 ccw(c198.365,86.664) 198.365,86.552 ccw(c198.365,86.664) 198.477,86.664 198.477,86.747 cw(c198.59,86.747) 198.59,86.86 198.836,86.86 199.843,86.86 200.099,86.604 200.099,86.311 199.738,85.95 J11.L6@199.5,85.95
SLOT6.LVDS_14_P: IC4.H31 J11.K6 | length 92.4
  TopLayer w0.095: IC4.H31@155.061,53.95 v1(155.561,54.45)
  layer 8 w0.075: 152.956,56.42 152.959,55.166 152.981,55.144 153.276,54.849 155.517,54.849 155.561,54.805 v1(155.561,54.45) ; 152.956,56.421 152.956,60.085 152.959,60.088 152.959,64.884 156.925,68.85 156.994,68.918 156.994,69.25 155.918,70.325 155.918,70.824 156.368,71.273 156.866,71.273 159.432,68.707 159.764,68.707 160.095,69.039 160.095,69.37 157.529,71.936 157.529,72.435 157.978,72.884 158.477,72.884 161.043,70.318 161.375,70.318 161.706,70.649 161.706,70.981 160.63,72.056 160.63,72.555 161.333,73.257 163.559,75.484 163.559,83.148 166.427,86.016 182.279,86.016 182.363,86.016 184.055,84.323 193.707,84.323 196.445,87.062 199.927,87.062 200.301,86.688 200.301,86.311 200.662,85.95 J11.K6@200.9,85.95
SLOT6.LVDS_15_N: IC4.L34 J33.F6 | length 95
  TopLayer w0.095: IC4.L34@158.061,50.95 v1(158.561,51.45)
  Layer 6 w0.08: v1(172.635,28.417) 172.635,28.37 172.475,28.21 172.475,25.836 175.354,22.957 197.254,22.957 199.167,21.044 208.302,21.044 208.496,21.238 208.496,21.599 208.145,21.95 J33.F6@207.9,21.95
  BottomLayer w0.095: v1(158.561,51.45) 158.228,51.45 158.172,51.394 158.172,51.111 158.233,51.05 174.05,51.05 176.136,48.964 176.216,48.884 176.545,48.555 176.884,48.555 177.944,49.615 178.466,49.615 178.935,49.147 178.935,48.624 176.285,45.975 176.285,45.637 176.624,45.298 176.962,45.298 178.121,46.457 178.643,46.457 178.708,46.392 178.788,46.312 179.883,45.217 179.883,38.163 172.483,30.763 172.483,28.625 172.635,28.472 v1(172.635,28.417)
SLOT6.LVDS_15_P: IC4.L33 J33.E6 | length 95.6
  TopLayer w0.095: IC4.L33@157.061,50.95 v1(157.561,51.45)
  Layer 6 w0.08: v1(172.109,28.417) 172.109,28.37 172.268,28.21 172.268,25.75 175.268,22.75 197.168,22.75 199.081,20.837 208.388,20.837 208.703,21.153 208.703,21.599 209.055,21.95 J33.E6@209.3,21.95
  BottomLayer w0.095: v1(157.561,51.45) 157.894,51.45 157.95,51.394 157.95,51.019 158.141,50.828 173.958,50.828 175.979,48.807 176.059,48.727 176.453,48.333 176.976,48.333 178.036,49.393 178.374,49.393 178.713,49.055 178.713,48.716 176.063,46.067 176.063,45.545 176.532,45.076 177.054,45.076 178.213,46.235 178.551,46.235 178.631,46.155 179.661,45.125 179.661,38.255 172.261,30.855 172.261,28.625 172.109,28.472 v1(172.109,28.417)
SLOT6_MGT.MGT_Rx_N: C440.2 IC4.C20 | length 34.4
  TopLayer w0.095: IC4.C20@144.061,58.95 v1(144.561,59.45)
  BottomLayer w0.095: v1(144.561,59.45) 144.561,59.117 144.617,59.061 144.964,59.061 145.15,58.875 145.15,58.331 145.406,58.075 161.061,58.075 176.844,58.075 176.891,58.122 176.934,58.122 C440.2@177.086,58.275
SLOT6_MGT.MGT_Rx_P: C436.2 IC4.D20 | length 34.4
  TopLayer w0.095: IC4.D20@144.061,57.95 v1(144.561,58.45)
  BottomLayer w0.095: v1(144.561,58.45) 144.561,58.783 144.617,58.839 144.872,58.839 144.928,58.783 144.928,58.24 145.314,57.853 161.061,57.853 176.78,57.853 176.835,57.798 176.835,57.791 177.061,57.565 C436.2@177.086,57.565
SLOT6_MGT.MGT_Tx_N: C233.1 IC4.C22 | length 38.4
  TopLayer w0.095: IC4.C22@146.061,58.95 v1(146.561,59.45) ; v6(147.706,63.405) 147.755,63.454 147.951,63.454 148.054,63.557 148.461,63.964 cw(c150.412,62.013) 148.463,63.966 cw(c150.412,62.013) 150.412,64.772 162.211,64.772 cw(c162.211,62.016) 164.16,63.965 169.075,59.05 ccw(c170.871,60.846) 170.871,58.306 176.853,58.306 176.909,58.362 176.909,58.398 177.061,58.55 C233.1@177.086,58.55
  BottomLayer w0.095: v1(146.561,59.45) 146.561,59.117 146.617,59.061 146.875,59.061 146.961,59.147 146.961,61.949 cw(c148.203,61.949) 146.961,61.952 cw(c148.203,61.949) 147.324,62.827 cw(c148.203,61.949) 147.325,62.828 147.657,63.16 147.657,63.356 v6(147.706,63.405)
SLOT6_MGT.MGT_Tx_P: C229.1 IC4.D22 | length 38.4
  TopLayer w0.095: IC4.D22@146.061,57.95 v1(146.561,58.45) ; v6(148.059,63.052) 148.108,63.101 148.108,63.297 148.276,63.465 148.617,63.806 cw(c150.413,62.01) 150.413,64.55 162.209,64.55 cw(c162.209,62.01) 164.005,63.806 168.918,58.893 ccw(c170.87,60.845) 168.921,58.89 ccw(c170.87,60.845) 170.867,58.084 ccw(c170.87,60.845) 170.87,58.084 176.853,58.084 176.909,58.029 176.909,57.993 177.061,57.84 C229.1@177.086,57.84
  BottomLayer w0.095: v1(146.561,58.45) 146.561,58.783 146.617,58.839 146.967,58.839 147.183,59.055 147.183,61.949 cw(c148.205,61.949) 147.482,62.671 147.814,63.003 148.01,63.003 v6(148.059,63.052)
SLOT7.LVDS_0_N: IC4.K6 J29.I4 | length 113.1
  TopLayer w0.095: v1(129.561,52.45) IC4.K6@130.061,51.95
  Layer 5 w0.08: v1(129.561,52.45) 129.911,52.45 129.957,52.497 129.957,52.903 129.957,53.658 130.356,54.057 131.847,54.057 132.194,53.71 132.194,50.917 133.028,50.083 140.821,50.083 141.268,49.636 141.268,44.907 142.168,44.007 142.168,43.25 142.361,43.057 144.947,43.057 145.161,42.843 145.161,29.15 149.661,24.65 163.368,24.65 170.659,31.941 170.875,31.941 172.068,31.941 cw(c172.068,31.313) 172.696,31.313 172.696,30.922 ccw(c173.117,30.922) 173.538,30.922 173.538,31.434 cw(c174.166,31.434) 174.794,31.434 174.794,30.922 ccw(c175.215,30.922) 175.636,30.922 175.636,31.434 cw(c176.264,31.434) 176.892,31.434 176.892,31.079 ccw(c177.313,31.079) 177.734,31.079 177.734,31.313 cw(c178.362,31.313) 178.362,31.941 179.123,31.941 181.401,31.941 182.303,32.843 191.945,32.843 192.716,33.614 198.334,33.614 198.898,33.05 204.073,33.05 204.296,33.273 204.296,33.599 203.945,33.95 J29.I4@203.7,33.95
SLOT7.LVDS_0_P: IC4.K7 J29.H4 | length 113.1
  TopLayer w0.095: v1(130.561,52.45) IC4.K7@131.061,51.95
  Layer 5 w0.08: v1(130.561,52.45) 130.211,52.45 130.164,52.497 130.164,52.818 130.164,53.573 130.442,53.85 131.761,53.85 131.987,53.624 131.987,50.831 132.942,49.876 140.735,49.876 141.061,49.55 141.061,44.821 141.961,43.921 141.961,43.164 142.275,42.85 144.861,42.85 144.954,42.757 144.954,29.064 149.575,24.443 163.454,24.443 170.745,31.734 170.875,31.734 172.068,31.734 cw(c172.068,31.313) 172.489,31.313 172.489,30.922 ccw(c173.117,30.922) 173.745,30.922 173.745,31.434 cw(c174.166,31.434) 174.587,31.434 174.587,30.922 ccw(c175.215,30.922) 175.843,30.922 175.843,31.434 cw(c176.264,31.434) 176.685,31.434 176.685,31.079 ccw(c177.313,31.079) 177.941,31.079 177.941,31.313 cw(c178.362,31.313) 178.362,31.734 179.123,31.734 181.486,31.734 182.389,32.636 192.031,32.636 192.802,33.407 198.249,33.407 198.813,32.843 204.159,32.843 204.503,33.187 204.503,33.599 204.855,33.95 J29.H4@205.1,33.95